# EasyEDA board PCB_PCB_RP2040-devboard_2026-10-12.brd
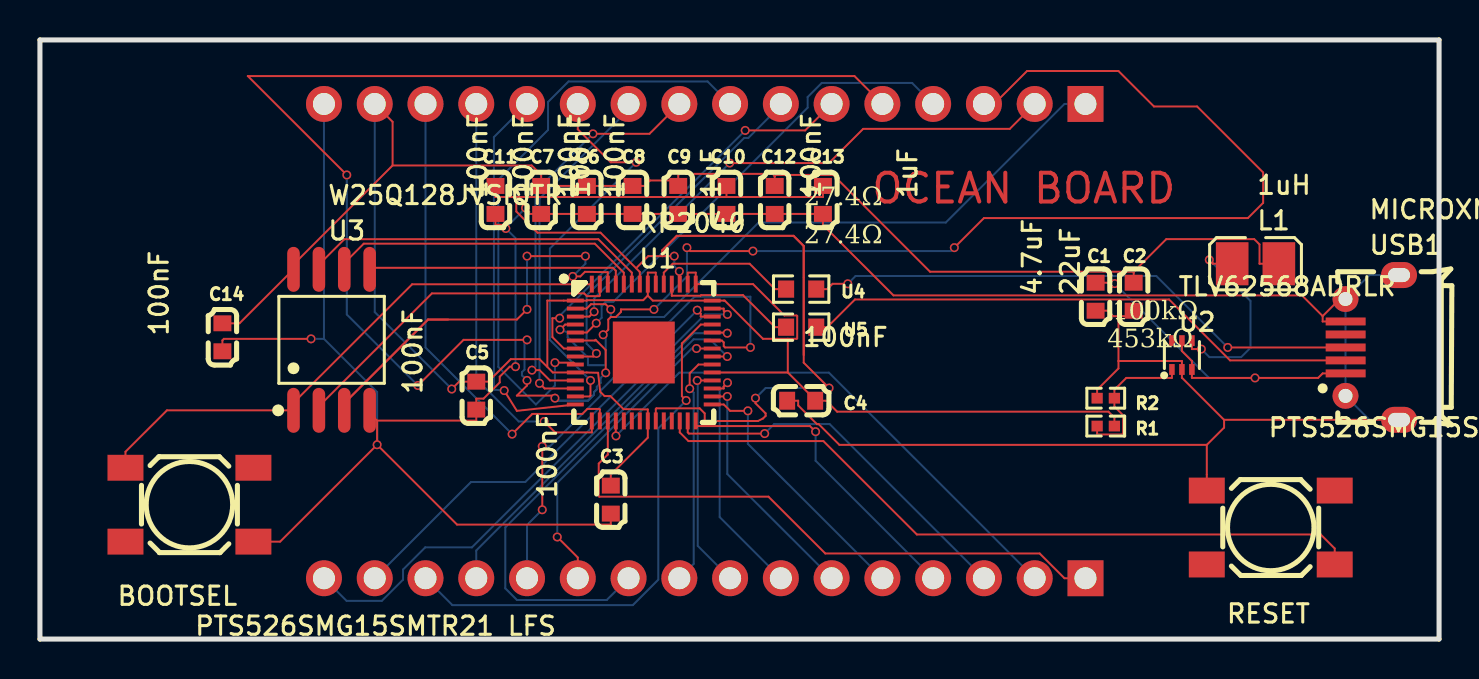
[diagram p0: board, top side]
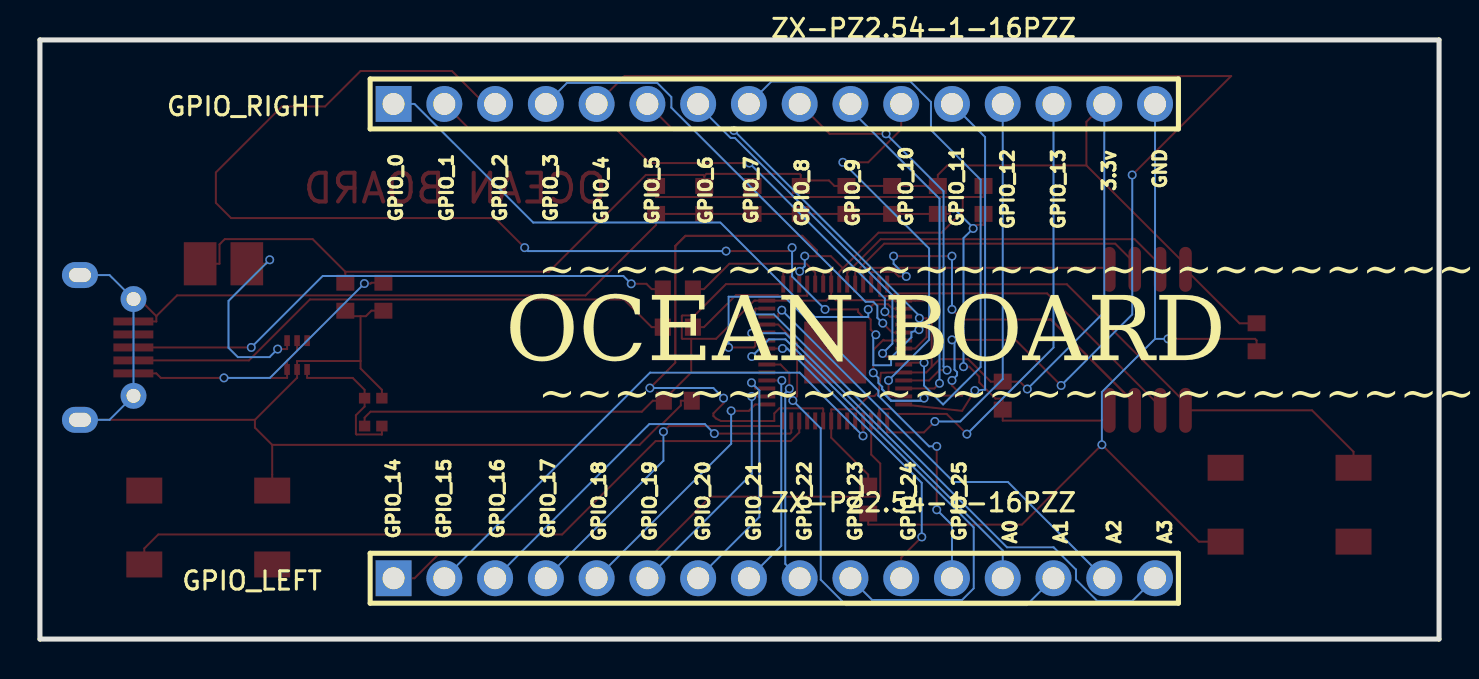
[diagram p1: board, bottom side, seen from below]

Outline 70 x 30 mm; copper layers: TopLayer, BottomLayer. Coordinates in mm from the lower left corner of the outline.
Outline path: 0,30 70,30 70,0 0,0 0,30

## Design rules (mm)
Default: track 0.1, clearance 0.1, via 0.45, via hole 0.3

## Placement (name value [footprint] x y rotation side)
BOOTSEL  PTS526SMG15SMTR21 LFS  [SW-SMD_4P-L4.8-W4.8-P3.70-LS6.4-1]  7.48 6.73 180 top
C1  4.7uF  [C0603]  52.82 17.14 90 top
C2  22uF  [C0603]  54.72 17.14 90 top
C3  100nF  [C0603]  28.56 6.98 90 top
C4  100nF  [C0603]  38.09 11.94 0 top
C5  100nF  [C0603]  21.83 12.19 90 top
C6  100nF  [C0603]  27.36 21.99 90 top
C7  100nF  [C0603]  25.08 21.99 90 top
C8  100nF  [C0603]  29.65 21.99 90 top
C9  100nF  [C0603]  31.93 21.99 90 top
C10  100nF  [C0603]  34.35 21.99 270 top
C11  100nF  [C0603]  22.79 21.99 270 top
C12  1uF  [C0603]  36.76 21.99 90 top
C13  1uF  [C0603]  39.17 21.99 270 top
C14  100nF  [C0603]  9.13 15.11 90 top
GPIO_LEFT  ZX-PZ2.54-1-16PZZ  [HDR-TH_16P-P2.54-V-M-2]  33.26 3.05 180 bottom
GPIO_RIGHT  ZX-PZ2.54-1-16PZZ  [HDR-TH_16P-P2.54-V-M-2]  33.26 26.79 180 bottom
L1  1uH  [L2520]  60.82 18.79 0 top
R1  453kΩ  [R0402]  53.32 10.67 0 top
R2  100kΩ  [R0402]  53.32 12.06 0 top
RESET  PTS526SMG15SMTR21 LFS  [SW-SMD_4P-L4.8-W4.8-P3.70-LS6.4-1]  61.58 5.59 0 top
U1  RP2040  [LQFN-56_L7.0-W7.0-P0.4-EP]  30.21 14.35 0 top
U2  TLV62568ADRLR  [SOT-563_L1.6-W1.2-P0.50-LS1.6-BL]  57.13 14.22 0 top
U3  W25Q128JVSIQTR  [SOIC-8_L5.3-W5.3-P1.27-LS8.0-BL]  14.59 14.98 0 top
U4  27.4Ω  [R0603]  38.09 17.52 0 top
U5  27.4Ω  [R0603]  38.09 15.62 0 top
USB1  MICROXNJ  [MICRO-USB-SMD_MICROXNJ_1]  66.66 14.6 0 top

## Footprints (pads in the part's own frame, mm; a bottom-side part is the same pattern mirrored in y, then rotated)
C0603
  rect 0.8x0.9 smd: 1(-0.7,0) 2(0.7,0)
HDR-TH_16P-P2.54-V-M-2
  rect 1.8x1.8 hole 1.1: 1(-19.05,0)
  oval 1.8x1.8 hole 1.1: 2(-16.51,0) 3(-13.97,0) 4(-11.43,0) 5(-8.89,0) 6(-6.35,0) 7(-3.81,0) 8(-1.27,0) 9(1.27,0) 10(3.81,0) 11(6.35,0) 12(8.89,0) 13(11.43,0) 14(13.97,0) 15(16.51,0) 16(19.05,0)
L2520
  rect 1.635x2.16 smd: 1(-1.168,0) 2(1.167,0)
LQFN-56_L7.0-W7.0-P0.4-EP
  rect 0.85x0.2 smd: 1(-3.425,2.6) 2(-3.425,2.2) 3(-3.425,1.8) 4(-3.425,1.4) 5(-3.425,1) 6(-3.425,0.6) 7(-3.425,0.2) 8(-3.425,-0.2) 9(-3.425,-0.6) 10(-3.425,-1) 11(-3.425,-1.4) 12(-3.425,-1.8) 13(-3.425,-2.2) 14(-3.425,-2.6) 29(3.425,-2.6) 30(3.425,-2.2) 31(3.425,-1.8) 32(3.425,-1.4) 33(3.425,-1) 34(3.425,-0.6) 35(3.425,-0.2) 36(3.425,0.2) 37(3.425,0.6) 38(3.425,1) 39(3.425,1.4) 40(3.425,1.8) 41(3.425,2.2) 42(3.425,2.6)
  rect 0.2x0.85 smd: 15(-2.6,-3.425) 16(-2.2,-3.425) 17(-1.8,-3.425) 18(-1.4,-3.425) 19(-1,-3.425) 20(-0.6,-3.425) 21(-0.2,-3.425) 22(0.2,-3.425) 23(0.6,-3.425) 24(1,-3.425) 25(1.4,-3.425) 26(1.8,-3.425) 27(2.2,-3.425) 28(2.6,-3.425) 43(2.6,3.425) 44(2.2,3.425) 45(1.8,3.425) 46(1.4,3.425) 47(1,3.425) 48(0.6,3.425) 49(0.2,3.425) 50(-0.2,3.425) 51(-0.6,3.425) 52(-1,3.425) 53(-1.4,3.425) 54(-1.8,3.425) 55(-2.2,3.425) 56(-2.6,3.425)
  rect 3.1x3.1 smd: 57(0,0)
MICRO-USB-SMD_MICROXNJ_1
  rect 2x0.4 smd: 1(-1.332,-1.3) 2(-1.332,-0.65) 3(-1.332,0) 4(-1.332,0.65) 5(-1.332,1.3)
  oval 1.3x1.3 hole 0.7: 6(-1.34,2.425) 9(-1.34,-2.425)
  oval 1.8x1.3 hole 1.1x0.7: 7(1.34,3.625) 8(1.34,-3.625)
R0402
  rect 0.566x0.54 smd: 1(-0.433,0) 2(0.433,0)
R0603
  rect 0.806x0.864 smd: 1(-0.753,0) 2(0.753,0)
SOIC-8_L5.3-W5.3-P1.27-LS8.0-BL
  oval 0.63x2.25 smd: 1(-1.905,-3.53) 2(-0.635,-3.53) 3(0.635,-3.53) 4(1.905,-3.53) 5(1.905,3.53) 6(0.635,3.53) 7(-0.635,3.53) 8(-1.905,3.53)
SOT-563_L1.6-W1.2-P0.50-LS1.6-BL
  rect 0.28x0.545 smd: 1(-0.5,-0.723) 2(0,-0.723) 3(0.5,-0.723) 4(0.5,0.722) 5(0,0.722) 6(-0.5,0.722)
SW-SMD_4P-L4.8-W4.8-P3.70-LS6.4-1
  rect 1.8x1.3 smd: 1(-3.2,1.85) 2(3.2,1.85) 3(-3.2,-1.85) 4(3.2,-1.85)

## Nets
3.3V: C2.2 C3.2 C4.2 C5.2 C6.2 C7.2 C8.2 C9.2 C12.2 C14.2 GPIO_RIGHT.15 L1.2 R1.2 U1.1 U1.10 U1.22 U1.33 U1.42 U1.43 U1.44 U1.48 U1.49 U3.8
+5V: C1.2 U2.3 U2.5 USB1.1
GND: BOOTSEL.1 C1.1 C2.1 C3.1 C4.1 C5.1 C6.1 C7.1 C8.1 C9.1 C10.2 C11.2 C12.1 C13.2 C14.1 GPIO_RIGHT.16 R2.1 RESET.1 U2.2 U3.4 USB1.5 USB1.6 USB1.7 USB1.8 USB1.9
A0: GPIO_LEFT.13 U1.38
A1: GPIO_LEFT.14 U1.39
A2: GPIO_LEFT.15 U1.40
A3: GPIO_LEFT.16 U1.41
GPIO_0: GPIO_RIGHT.1 U1.2
GPIO_1: GPIO_RIGHT.2 U1.3
GPIO_2: GPIO_RIGHT.3 U1.4
GPIO_3: GPIO_RIGHT.4 U1.5
GPIO_4: GPIO_RIGHT.5 U1.6
GPIO_5: GPIO_RIGHT.6 U1.7
GPIO_6: GPIO_RIGHT.7 U1.8
GPIO_7: GPIO_RIGHT.8 U1.9
GPIO_8: GPIO_RIGHT.9 U1.11
GPIO_9: GPIO_RIGHT.10 U1.12
GPIO_10: GPIO_RIGHT.11 U1.13
GPIO_11: GPIO_RIGHT.12 U1.14
GPIO_12: GPIO_RIGHT.13 U1.15
GPIO_13: GPIO_RIGHT.14 U1.16
GPIO_14: GPIO_LEFT.1 U1.17
GPIO_15: GPIO_LEFT.2 U1.18
GPIO_16: GPIO_LEFT.3 U1.27
GPIO_17: GPIO_LEFT.4 U1.28
GPIO_18: GPIO_LEFT.5 U1.29
GPIO_19: GPIO_LEFT.6 U1.30
GPIO_20: GPIO_LEFT.7 U1.31
GPIO_21: GPIO_LEFT.8 U1.32
GPIO_22: GPIO_LEFT.9 U1.34
GPIO_23: GPIO_LEFT.10 U1.35
GPIO_24: GPIO_LEFT.11 U1.36
GPIO_25: GPIO_LEFT.12 U1.37
QSPI_SCLK: U1.52 U3.6
QSPI_SD0: U1.53 U3.5
QSPI_SD1: U1.55 U3.2
QSPI_SD2: U1.54 U3.3
QSPI_SD3: U1.51 U3.7
QSPI_SS: BOOTSEL.4 U1.56 U3.1
U1_19: U1.19
U1_24: U1.24
U1_25: U1.25
U1_26: RESET.4 U1.26
U1_46: U1.46 U5.1
U1_47: U1.47 U4.1
U1_50: C10.1 C11.1 C13.1 U1.23 U1.45 U1.50
U1_57: U1.57
U2_1: R1.1 R2.2 U2.1
U2_4: L1.1 U2.4
USB_D+: U4.2 USB1.3
USB_D-: U5.2 USB1.2

Pads without a net: BOOTSEL 2 3; RESET 2 3; U1 20 21; U2 6; USB1 4

## Via types
v1: diameter 0.45, hole 0.3, TopLayer to BottomLayer, 66 vias

## Routing (per net, layer and track width the routed paths; a pad name or vN(x,y) marks a point on that pad's centre or on a via; arc(x,y) is an arc through that point)
3.3V: length 149
  TopLayer w0.1: 38.83,11.94 39.34,11.94 39.89,11.38 53.46,11.38 53.76,11.09 R1.2 ; 38.83,11.94 C4.2 ; 38.83,11.94 37.42,13.35 ; GPIO_RIGHT.15 17.64,25.9 17.64,23.72 ; 17.64,23.72 12.69,18.76 U3.8 9.98,15.81 C14.2 ; 17.64,23.72 24.6,23.72 25.08,23.24 C7.2 C6.2 C8.2 30.25,22.69 30.52,22.96 31.93,22.96 ; 31.93,22.96 31.93,23.24 31.99,23.29 36.66,23.29 36.76,23.19 ; 31.93,22.96 C9.2 ; C2.2 54.72,18.39 ; 37.42,13.35 U1.33 ; 37.42,13.35 37.42,15.03 ; 37.42,15.03 36.17,15.03 34.26,16.95 U1.42 30.66,16.95 30.41,17.2 ; 37.42,15.03 37.86,15.03 37.89,15.06 37.89,16.17 37.86,16.2 37.25,16.2 35.68,17.77 32.81,17.77 32.81,18.35 32.41,18.35 U1.44 ; 30.81,17.77 30.81,18.35 30.41,18.35 U1.49 30.41,17.2 ; 30.41,17.2 30.18,16.97 27.38,16.97 27.36,16.95 U1.1 26.21,16.95 25.38,16.95 25.38,13.64 ; C12.2 36.76,23.19 ; 30.41,11.5 U1.22 30.41,10.08 28.56,8.23 C3.2 ; 54.72,18.39 56.35,20.03 60.75,20.03 61.02,19.76 61.02,18.79 L1.2 ; 54.72,18.39 54.72,18.39 44.53,18.39 39.69,23.24 36.81,23.24 36.76,23.19 ; 30.41,11.5 29.19,11.51 28.54,12.17 28.25,12.17 28.03,12.39 27.93,13.33 27.36,13.35 U1.10 25.66,13.35 24.99,14.02 23.56,14.02 22.43,12.89 C5.2 20.97,12.89 v1(20.6,12.52)
  BottomLayer w0.1: v1(20.6,12.52) 16.75,16.37 GPIO_RIGHT.15
+5V: length 19.8
  TopLayer w0.1: C1.2 53.42,17.84 53.46,17.8 v1(53.77,17.8) ; U2.5 57.13,14.42 57.64,13.92 U2.3 57.64,13.08 v1(60.79,13.08) 63.95,13.08 64.18,13.3 USB1.1
  BottomLayer w0.1: v1(53.77,17.8) 58.49,13.08 v1(60.79,13.08)
GND: length 171.5
  TopLayer w0.1: C11.2 22.79,20.74 23.13,20.74 v1(23.31,20.56) ; BOOTSEL.1 12.02,4.88 v1(16.87,9.73) ; C2.1 54.72,16.17 53.96,16.17 ; C1.1 53.42,16.44 53.69,16.17 53.96,16.17 ; R2.1 52.89,12.48 53.96,13.55 53.96,13.92 ; 53.96,13.92 57.13,13.92 57.13,13.92 U2.2 57.13,13.08 57.15,13.08 59.25,10.98 ; 53.96,13.92 53.96,16.17 ; v1(16.87,9.73) 20.87,5.73 28.56,5.73 C3.1 ; v1(16.87,9.73) 16.87,10.94 ; 58.38,9.72 40,9.72 38.96,10.76 38.87,10.76 37.94,11.7 37.94,11.94 37.38,11.94 ; 58.38,9.72 59.25,10.59 59.25,10.98 ; 58.38,9.72 RESET.1 ; 16.87,10.94 21.83,10.94 C5.1 21.83,12.04 22.19,12.04 23,12.85 23,13.14 23.5,13.64 v1(23.79,13.64) ; 16.87,10.94 16.5,11.31 U3.4 ; 64.18,16.17 63.14,17.21 42.7,17.21 39.17,20.74 C13.2 C12.1 C10.2 C9.1 C8.1 C6.1 C7.1 24.48,21.29 24.48,21.4 v1(24.3,21.59) ; 64.18,16.17 64.18,15.9 USB1.5 ; 64.18,16.17 65.03,17.03 65.32,17.03 ; 59.25,10.98 USB1.8 ; 13.56,15.03 9.2,15.03 9.13,14.96 C14.1
  BottomLayer w0.1: 14.21,15.03 13.56,15.03 ; 14.21,15.03 GPIO_RIGHT.16 ; 14.21,15.03 16.87,12.37 v1(16.87,9.73) ; USB1.7 66.52,18.23 65.32,17.03 USB1.9 66.52,10.98 USB1.8 ; v1(23.79,13.64) 23.79,20.08 v1(23.31,20.56) 23.31,20.6 v1(24.3,21.59)
  vias: v1(13.56,15.03)
A0: length 19.2
  TopLayer w0.1: U1.38 34.36,15.35 v1(34.39,15.32)
  BottomLayer w0.1: GPIO_LEFT.13 21.83,4.43 32.71,15.32 v1(34.39,15.32)
A1: length 27.1
  TopLayer w0.1: U1.39 33.06,15.75 32.12,14.81 32.12,12.16 v1(32.33,11.95)
  BottomLayer w0.1: v1(32.33,11.95) 30.94,10.55 30.94,2.97 29.66,1.7 20.63,1.7 GPIO_LEFT.14
A2: length 22.7
  TopLayer w0.1: v1(32.88,16.47) 33.06,16.29 33.06,16.15 U1.40
  BottomLayer w0.1: GPIO_LEFT.15 21.57,7.87 24.28,7.87 v1(32.88,16.47)
A3: length 27.8
  TopLayer w0.1: U1.41 34.21,16.55 34.21,16.44 v1(34.39,16.26)
  BottomLayer w0.1: GPIO_LEFT.16 15.34,1.91 17.1,1.91 18.17,2.97 18.17,3.48 19.28,4.59 21.61,4.59 33.28,16.26 v1(34.39,16.26)
GPIO_0: length 30.5
  TopLayer w0.1: v1(28.56,16.51) 28.3,16.77 27.57,16.77 27.35,16.55 U1.2
  BottomLayer w0.1: v1(28.56,16.51) 28.56,16.13 31.23,16.13 35.96,20.86 45.32,20.86 51.26,26.79 GPIO_RIGHT.1
GPIO_1: length 27.8
  TopLayer w0.1: v1(34.51,23.84) 39.48,23.84 41.19,25.55 48.52,25.55 GPIO_RIGHT.2 ; v1(27.73,16.39) 27.48,16.15 U1.3
  BottomLayer w0.1: v1(34.51,23.84) 27.73,17.05 v1(27.73,16.39)
GPIO_2: length 61.3
  TopLayer w0.1: v1(32.37,19.6) 32.54,19.43 v1(35.67,19.43) ; v1(30.72,16.51) 29.07,16.51 29.07,16.38 28.81,16.13 28.56,16.13 28.43,16 28.43,15.49 v1(28.18,15.24) ; v1(26.02,15.49) 26.28,15.75 U1.4 ; GPIO_RIGHT.3 47.74,26.79 49.39,28.45 53.96,28.45 55.74,26.67 57.9,26.67 61.2,23.37 61.2,21.84 60.44,21.08 47.23,21.08 45.71,19.56
  BottomLayer w0.1: v1(30.72,16.51) 32.37,18.16 v1(32.37,19.6) ; v1(35.67,19.43) 45.58,19.43 v1(45.75,19.6) ; v1(26.02,15.49) 26.4,15.36 26.4,15.11 27.42,14.09 27.42,13.71 28.31,13.71 28.31,15.11 v1(28.18,15.24)
GPIO_3: length 24.2
  TopLayer w0.1: U1.5 27.36,15.35 v1(27.83,15.82)
  BottomLayer w0.1: GPIO_RIGHT.4 43.64,27.85 39.11,27.85 38.41,27.14 38.41,26.61 28.69,16.89 28.31,16.89 28.1,16.69 28.1,16.09 27.83,15.82
GPIO_4: length 71.7
  TopLayer w0.1: v1(15.35,23.24) 10.4,28.19 40.75,28.19 GPIO_RIGHT.5 ; v1(18.91,12.7) 21.19,14.98 v1(24.37,14.98) ; v1(24.37,12.95) 24.37,12.7 23.86,12.19 25.64,12.19 v1(25.77,12.06) ; U1.6 27.76,14.95 27.8,14.98 28.31,14.48 v1(28.31,13.33)
  BottomLayer w0.1: v1(24.37,12.95) 24.12,13.21 24.12,13.37 24.24,13.49 24.24,14.86 v1(24.37,14.98) ; 25.89,11.94 v1(25.77,12.06) 25.89,11.94 ; 25.89,11.94 27.42,11.94 ; 25.89,11.94 27.42,11.94 ; 27.72,12.37 27.86,12.51 ; 27.72,12.37 27.86,12.51 ; 27.72,12.37 27.72,12.24 ; 27.72,12.37 27.72,12.24 ; 27.86,12.51 27.86,12.63 28.05,12.82 28.05,13.08 v1(28.31,13.33) ; 27.42,11.94 27.72,12.24 ; 27.42,11.94 27.72,12.24 ; v1(18.91,12.7) 15.35,16.25 v1(15.35,23.24)
GPIO_5: length 20.8
  TopLayer w0.1: v1(35.28,25.47) 38.28,25.47 GPIO_RIGHT.6 ; U1.7 26.21,14.55 25.64,15.12 25.64,16.07 26,16.07
  BottomLayer w0.1: v1(26,16.07) 26,16.19 v1(35.28,25.47)
GPIO_6: length 18
  TopLayer w0.1: v1(27.84,14.3) 27.69,14.15 U1.8
  BottomLayer w0.1: v1(27.84,14.3) 27.35,14.79 27.35,17.21 35.23,25.09 35.44,25.09 37.07,26.72 GPIO_RIGHT.7
GPIO_7: length 30.5
  TopLayer w0.1: U1.9 26.69,13.84 v1(25.77,13.84)
  BottomLayer w0.1: v1(25.77,13.84) 25.77,12.69 24.81,11.74 22.93,13.62 22.93,23 25.42,25.49 25.42,26.89 26.45,27.92 33.4,27.92 GPIO_RIGHT.8
GPIO_8: length 20.4
  TopLayer w0.1: v1(27.67,25.3) 30.49,25.3 GPIO_RIGHT.9 ; v1(24.62,13.47) 24.62,13.47 25,13.47 25.52,12.95 U1.11
  BottomLayer w0.1: v1(24.62,13.47) 24.79,13.64 24.79,22.42 v1(27.67,25.3)
GPIO_9: length 17.7
  TopLayer w0.1: U1.12 25.25,12.55 v1(24.99,12.81)
  BottomLayer w0.1: v1(24.99,12.81) 24.99,22.05 29.45,26.51 GPIO_RIGHT.10
GPIO_10: length 20
  TopLayer w0.1: v1(29.83,23.87) 28.56,23.87 26.91,25.52 GPIO_RIGHT.11 ; U1.13 27.5,12.15 27.54,12.19 v1(27.54,12.95)
  BottomLayer w0.1: v1(29.83,23.87) 25.51,19.56 25.51,14.98 v1(27.54,12.95)
GPIO_11: length 19.6
  TopLayer w0.1: 26.79,11.75 23.86,11.43 v1(23.23,12.44)
  BottomLayer w0.1: GPIO_RIGHT.12 22.71,25.14 22.71,12.49 v1(23.23,12.44)
GPIO_12: length 21.2
  TopLayer w0.1: U1.15 27.61,10.35 25.77,10.35 v1(25.22,10.9)
  BottomLayer w0.1: GPIO_RIGHT.13 21.83,13.02 23.95,10.9 v1(25.22,10.9)
GPIO_13: length 23.8
  TopLayer w0.1: U1.16 28.01,11.5 27.99,11.52 27.39,11.52 27.14,11.27 24.63,11.27 v1(23.62,10.26)
  BottomLayer w0.1: GPIO_RIGHT.14 19.29,14.6 v1(23.62,10.26)
GPIO_14: length 30
  TopLayer w0.1: GPIO_LEFT.1 51.26,3.05 50.02,4.29 39.29,4.29 36.45,7.13 27.99,7.13 27.96,7.16 27.96,8.79 28.41,9.24 U1.17
GPIO_15: length 27.3
  TopLayer w0.1: U1.18 28.81,10.18 v1(28.82,10.17)
  BottomLayer w0.1: GPIO_LEFT.2 39.47,13.34 31.99,13.34 v1(28.82,10.17)
GPIO_16: length 18.8
  TopLayer w0.1: v1(36.26,10.29) 32.47,10.29 32.41,10.35 U1.27
  BottomLayer w0.1: GPIO_LEFT.3 39.51,10.77 36.74,10.77 v1(36.26,10.29)
GPIO_17: length 16.1
  TopLayer w0.1: 32.81,10.92 32.81,10.67 38.52,10.67 v1(38.81,10.38)
  BottomLayer w0.1: GPIO_LEFT.4 38.81,8.93 v1(38.81,10.38)
GPIO_18: length 13.1
  TopLayer w0.1: U1.29 34.21,11.75 34.53,11.43 v1(35.42,11.43)
  BottomLayer w0.1: v1(35.42,11.43) 35.42,9.78 GPIO_LEFT.5
GPIO_19: length 12
  TopLayer w0.1: U1.30 v1(34.39,12.15)
  BottomLayer w0.1: v1(34.39,12.15) 34.39,8.27 GPIO_LEFT.6
GPIO_20: length 12.2
  TopLayer w0.1: U1.31 34.21,12.55 34.21,12.65 v1(34.4,12.84)
  BottomLayer w0.1: v1(34.4,12.84) 34.01,12.44 34.01,6.11 GPIO_LEFT.7
GPIO_21: length 11.3
  TopLayer w0.1: v1(32.88,12.95) U1.32
  BottomLayer w0.1: GPIO_LEFT.8 32.91,4.66 32.91,12.92 v1(32.88,12.95)
GPIO_22: length 12
  TopLayer w0.1: U1.34 32.95,13.75 32.51,13.31 v1(32.51,12.54)
  BottomLayer w0.1: GPIO_LEFT.9 32.71,3.76 32.71,12.34 v1(32.51,12.54)
GPIO_23: length 26
  TopLayer w0.1: U1.35 v1(34.39,14.15)
  BottomLayer w0.1: GPIO_LEFT.10 28.36,1.95 23.87,1.95 23.28,2.54 23.28,5.59 32.7,15.01 33.53,15.01 v1(34.39,14.15)
GPIO_24: length 15.7
  TopLayer w0.1: GPIO_LEFT.11 26.91,4.08 v1(25.88,5.11) ; U1.36 v1(32.85,14.55)
  BottomLayer w0.1: v1(25.88,5.11) 25.88,7.82 32.61,14.55 v1(32.85,14.55)
GPIO_25: length 25.3
  TopLayer w0.1: v1(25.13,6.47) v1(25.13,9.65) ; v1(35.54,14.6) 34.28,14.6 34.21,14.67 34.21,14.86 34.12,14.95 U1.37
  BottomLayer w0.1: v1(25.13,6.47) 24.37,5.71 GPIO_LEFT.12 ; v1(25.13,9.65) 25.51,9.65 28.05,12.19 28.05,12.44 32.75,17.14 35.54,17.14 v1(35.54,14.6)
QSPI_SCLK: length 15.9
  TopLayer w0.1: U3.6 15.22,18.82 16.2,19.8 27.76,19.8 29.21,18.35 U1.52
QSPI_SD0: length 13.1
  TopLayer w0.1: U3.5 16.57,18.59 28.66,18.59 28.81,18.44 U1.53
QSPI_SD1: length 17.2
  TopLayer w0.1: U3.2 13.96,11.65 19.61,17.31 27.23,17.31 27.37,17.17 27.98,17.17 28.01,17.2 U1.55
QSPI_SD2: length 28.1
  TopLayer w0.1: 15.22,11.81 19.42,16 ; 15.22,11.81 U3.3 15.22,11.81 ; 15.22,11.81 19.42,16 ; 19.42,16 23.86,16 v1(24.37,16.51) ; 19.42,16 20.43,16 ; v1(24.37,19.17) v1(27.29,19.17) ; U1.54 28.41,18.37 27.27,18.39 27.04,18.16 v1(26.66,18.16)
  BottomLayer w0.1: v1(26.66,18.16) 27.29,18.79 v1(27.29,19.17) ; v1(24.37,16.51) v1(24.37,19.17)
QSPI_SD3: length 17.7
  TopLayer w0.1: U1.51 29.61,18.35 27.94,20.02 15.23,20.02 13.96,18.75 U3.7
QSPI_SS: length 27.8
  TopLayer w0.1: U1.56 27.6,17.77 18.62,17.77 12.69,11.83 U3.1 6.35,11.45 4.28,9.38 BOOTSEL.4
U1_26: length 36.6
  TopLayer w0.1: U1.26 32.01,10.35 32.45,9.91 39.2,9.91 43.87,5.24 64.08,5.24 64.78,4.54 RESET.4
U1_46: length 7
  TopLayer w0.1: U1.46 31.61,17.2 31.62,17.19 33.05,17.19 33.09,17.22 35.17,17.22 36.78,15.62 U5.1
U1_47: length 7.4
  TopLayer w0.1: 36.78,17.52 35.51,18.79 31.66,18.79 31.21,18.35 U1.47 ; U4.1 36.78,17.52
U1_50: length 71
  TopLayer w0.1: 34.35,22.14 34.35,22.14 23.83,22.14 ; 34.35,22.14 C10.1 ; 34.35,22.14 34.35,22.14 39.17,22.14 39.17,22.14 C13.1 ; 37.7,20.19 38.21,19.68 ; 37.7,20.19 31.86,20.19 ; 37.7,20.19 38.21,19.68 ; 37.7,20.19 31.86,20.19 ; 38.21,19.68 38.21,13.84 v1(39.48,12.57) ; 38.21,19.68 38.21,14.22 ; 31.86,20.19 31.13,19.46 ; 31.86,20.19 31.13,19.46 ; 23.83,22.14 23.83,21.41 24.89,20.35 28.05,20.35 30.01,18.38 U1.50 ; 23.83,22.14 22.79,22.14 22.79,22.14 C11.1 ; 31.13,19.46 31.13,19.17 31.13,19.46 ; v1(31.74,19.17) 30.43,19.17 29.83,18.57 ; v1(35.8,12.06) 35.8,11.81 36.31,11.3 36.31,11.17 36.18,11.05 35.93,10.92 33.26,10.92 33.26,11.3 33,11.55 30.85,11.55 30.81,11.52 U1.23 ; v1(31.99,18.41) 32.01,17.77
  BottomLayer w0.1: v1(35.8,12.06) 36.31,12.57 v1(39.48,12.57) ; v1(31.99,18.41) 31.74,18.67 v1(31.74,19.17)
U2_1: length 7.7
  TopLayer w0.1: R1.1 52.89,10.24 52.89,10.24 54.16,10.24 54.19,10.27 54.19,11.21 53.76,11.64 R2.2 53.76,12.48 54.35,13.08 56.64,13.08 U2.1
U2_4: length 10.2
  TopLayer w0.1: L1.1 58.68,18.79 58.68,18.81 v1(58.51,18.99) ; v1(58.11,14.52) 57.64,14.52 U2.4
  BottomLayer w0.1: v1(58.11,14.52) 58.51,14.12 60.1,14.12 60.57,14.59 60.57,16.93 v1(58.51,18.99)
USB_D+: length 28.2
  TopLayer w0.1: USB1.3 v1(59.43,14.6) ; v1(40.42,17.79) 39.66,17.79 39.39,17.52 U4.2
  BottomLayer w0.1: v1(40.42,17.79) 40.81,18.18 55.85,18.18 v1(59.43,14.6)
USB_D-: length 28.3
  TopLayer w0.1: USB1.2 59.55,13.95 56.49,17.01 40.78,17.01 39.39,15.62 U5.2

## Text on the board
BottomSilkLayer: A3 | GND | A2 | 3.3v | A1 | GPIO_13 | A0 | GPIO_12 | GPIO_25 | GPIO_11 | GPIO_24 | GPIO_10 | GPIO_23 | GPIO_9 | GPIO_22 | GPIO_8 | GPIO_21 | GPIO_7 | GPIO_6 | GPIO_20 | GPIO_5 | GPIO_19 | GPIO_4 | GPIO_18 | GPIO_3 | GPIO_17 | GPIO_2 | GPIO_16 | GPIO_1 | GPIO_15 | GPIO_0 | GPIO_14 | ~~~~~~~~~~~~~~~~~~~~~~~~~~~~~~~~~~~~ | OCEAN BOARD
TopLayer: OCEAN BOARD
